# Altium PCB SYNCBOX.PcbDoc (part 6 of 6)
Units mil, origin at the board's own origin, x right, y up, seen from the top; angles counter-clockwise.
Board outline 8392.2 x 6163.59 mil, 6 copper layers (L1, L2, L3, L4 (PWR), L5, L6), stack 60.709 mil thick; 316 components, 422 nets, 1421 pads, 499 vias.
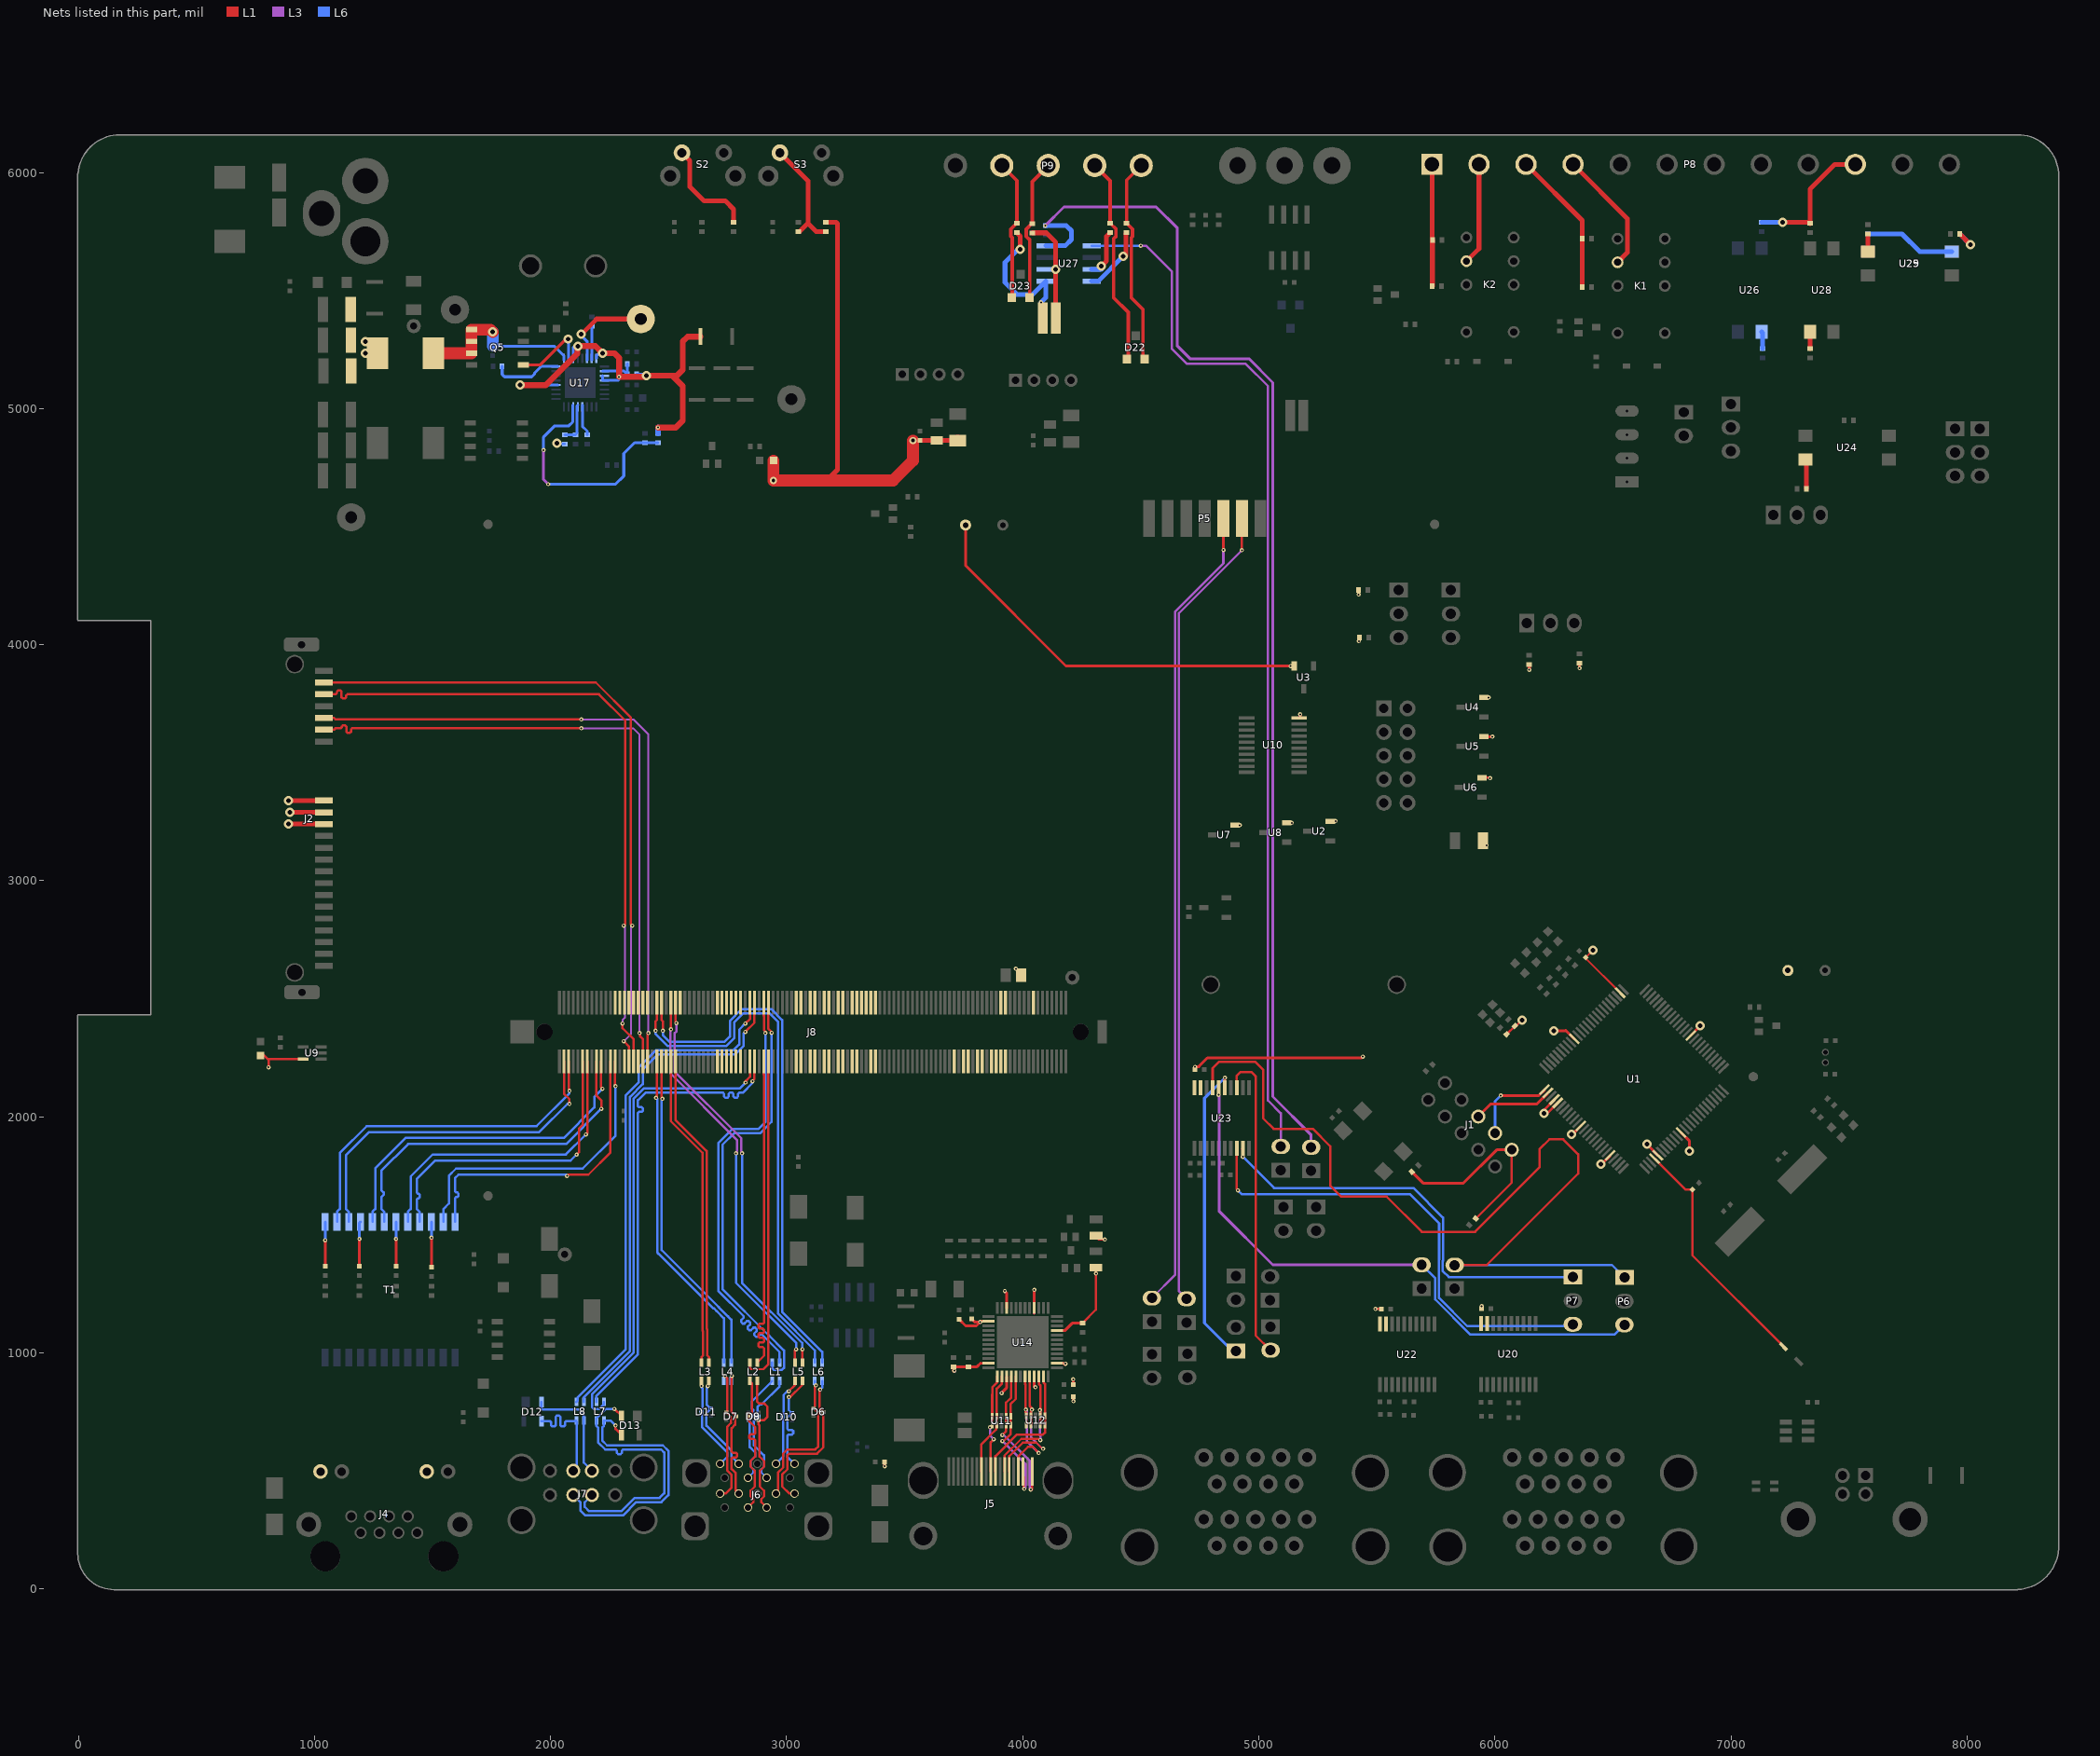
[diagram p8: the nets of this part, all layers, seen from the top]

## Via types
v1: diameter 17.72, hole 7.87, L1 to L6, tented both sides, 369 vias
v2: diameter 39.37, hole 19.68, L1 to L6, tented both sides, 116 vias
v3: diameter 236.22, hole 110.24, L1 to L6, 4 vias
v4: diameter 283.46, hole 125.98, L1 to L6, 4 vias
v5: diameter 472.44, hole 393.7, L1 to L6, 4 vias
v6: diameter 30, hole 15, L1 to L6, tented both sides, 2 vias

## Nets (pads, with @x,y where several pads share a name; then routed paths per layer and width w, separated by ;. In a path a pad name is that pad's centre, name@x,y a point inside that pad or via, vN(x,y) a via of type N, cw(c..) or ccw(c..) an arc to the next point about the centre after c; other vN are vias at no path point) (continued)
NetR27_1: R27.1 U17.24 | length 295.5
  L6 w12: R27.1@1794.68,5180 1794.68,5145.31 1805,5135 1920,5135 1931.91,5146.91 1931.91,5151.18 1959.63,5178.9 U17.24@2022.51,5178.9 U17.24@2030.51,5178.9
NetR28_2: R28.2 R29.2 U17.14 | length 1023.7
  L3 w12: v1(1970,4825) 1970,4700 v1(1990,4680)
  L6 w12: v1(1970,4825) 1970,4880 2017.5,4927.5 2077.5,4927.5 2094,4944 U17.14@2094,5015.51 ; v1(1990,4680) 2275,4680 2310,4715 2310,4810 2355.63,4855.63 R29.2@2400,4855.63 R28.2@2455,4855.63
NetR30_1: R30.1 U17.31 | length 145.8
  L6 w12: U17.31@2174.21,5204.49 U17.31@2174.21,5212.49 2174.21,5349.21 R30.1@2175,5350
NetR31_2: R31.2 U17.12 | length 133.9
  L6 w12: U17.12@2134.84,5015.51 U17.12@2134.84,5007.51 2134.84,4925.16 2155,4905 R31.2@2155,4890
NetR32_1: R32.1 R33.1 U17.13 | length 174.7
  L6 w12: R32.1@2060,4890 R33.1@2105,4890 2111.91,4896.91 2111.91,5012.26 U17.13@2115.16,5015.51
NetR34_2: R34.2 R35.2 U17.2 | length 156.8
  L6 w12: U17.2@2219.49,5159.21 U17.2@2227.49,5159.21 2311.1,5159.21 R35.2@2325.31,5145 2325.31,5189.69 R34.2@2325,5190
NetR36_2: R36.2 S2.2 | length 437.9
  L1 w20: S2.2@2556.42,6084.02 2590,6050.43 2590,5940 2650,5880 2740,5880 2775,5845 R36.2@2775,5789.37
NetR55_2: R55.2 U24.2 | length 126.7
  L1 w20: U24.2@7315.67,4785 7319.69,4780.98 R55.2@7319.69,4660
NetR60_1: R60.1 R76.1 U27.1 | length 565.1
  L1 w20: R76.1@3975,5745.31 3990,5730.31 v2(3990,5675)
  L6 w20: v2(3990,5675) 3980.31,5675 3925,5619.69 3925,5535 3976.2,5483.8 4041.8,5483.8 U27.1@4098,5540 4098,5470.5 v1(4077.5,5450)
NetR60_2: R60.2 R74.1 U27.2 | length 437.7
  L1 w20: R74.1@4040,5745 4100,5745 4140,5705 v2(4140,5590) 4140,5384.28 R60.2@4139.72,5384
NetR61_2: R61.2 U25.1 | length 75.6
  L1 w20: R61.2@7580,5740.31 7580.67,5739.65 U25.1@7580.67,5665
NetR62_2: R62.2 U26.1 | length 73.1
  L6 w20: U26.1@7130,5325.67 7135,5320.67 R62.2@7135,5254.69
NetR63_1: R63.1 U27.8 | length 288.9
  L1 w20: v2(4425,5645) 4435,5645 4436.59,5646.59 4436.59,5741.91 R63.1@4440,5745.31
  L6 w20: U27.8@4292,5540 4320,5540 v2(4425,5645)
NetR64_1: R64.1 U27.7 | length 216.7
  L1 w20: v2(4333.58,5603.91) 4355,5625.33 4355,5730.31 R64.1@4370,5745.31
  L6 w20: U27.7@4292,5590 4332.51,5590 4340,5597.49 v2(4333.58,5603.91)
NetR73_2: R73.2 U28.1 | length 70.3
  L1 w20: R73.2@7335,5254.69 U28.1@7335,5325
NetR75_2: R75.2 U29.1 | length 386.3
  L6 w20: R75.2@7580,5740.63 7724.37,5740.63 7800,5665 U29.1@7935,5665
PC2TRANS_PC_RX: J18.1 U23.15 | length 1303.9
  L1 w12: U23.15@4855.77,2123.87 4855.77,2164.77 v1(4856,2165)
  L6 w12: v1(4856,2165) 4770,2079 4770,1126 J18.1@4903,993
PC2TRANS_PC_TX: J21.2 U23.13 | length 1331.3
  L1 w10: U23.13@4906.95,2123.87 4906.95,2173.95 4923,2190 4968,2190 4986,2172 4987,2172 4987,1074 J21.2@5050,1011
PCIE_CLK_REF+: J8.A88
PCIE_CLK_REF-: J8.A89
PCIE_RX0+: J8.B68
PCIE_RX0-: J8.B69
PCIE_RX1+: J8.B64
PCIE_RX1-: J8.B65
PCIE_RX2+: J8.B61
PCIE_RX2-: J8.B62
PCIE_RX3+: J8.B58
PCIE_RX3-: J8.B59
PCIE_TX0+: J8.A68
PCIE_TX0-: J8.A69
PCIE_TX1+: J8.A64
PCIE_TX1-: J8.A65
PCIE_TX2+: J8.A61
PCIE_TX2-: J8.A62
PCIE_TX3+: J8.A58
PCIE_TX3-: J8.A59
PGEC: J1.3 U1.26 | length 365.5
  L1 w12: v1(6025,2090) 6185.93,2090 U1.26@6210.83,2114.9
  L6 w12: J1.3@6000.71,1930.71 6000.71,2065.71 v1(6025,2090)
PGED: J1.5 U1.27 | length 336
  L1 w12: J1.5@5930,2001.42 5983.58,2055 6178.77,2055 U1.27@6224.75,2100.98
PHASE2_3V3: C47.1 L10.1 Q5.5 Q5.6 Q5.7 U17.25 | length 761.9
  L1 w50: L10.1@1494,5235 L10.1@1503,5235 Q5.7@1665,5235 Q5.6@1665,5285 Q5.5@1665,5335 1745,5335 v2(1755,5325)
  L6 w12: C47.1@1755,5264.37 2016.08,5264.37 2056.1,5224.35 U17.25@2056.1,5212.49 U17.25@2056.1,5204.49
  L6 w50: C47.1@1755,5265.75 v2(1755,5325)
PWR_OUT2: C5.2 C8.2 C16.2 C17.2 C18.2 C19.2 C51.2 C52.2 C53.2 C60.2 C61.2 C69.1 C74.2 C79.2 D3.1 D14.1 F1.2 F4.1 J1.1 J2.8 J2.9 J2.10 J4.10 J4.12 L10.2 LS1.1 LS2.1 R3.2 R5.2 R13.2 R14.2 R16.2 R17.2 R18.2 R22.1 R23.1 R24.1 R32.2 R38.2 R45.2 R46.2 R59.2 R67.2 R68.2 R72.2 TP3.1 U1.2 U1.16 U1.29 U1.30 U1.37 U1.46 U1.55 U1.62 U1.86 U2.2 U3.2 U4.2 U5.2 U6.2 U7.2 U8.2 U9.5 U10.20 U14.2 U14.11 U14.15 U14.21 U14.26 U14.33 U14.40 U14.46 U17.30 U20.19 U20.20 U22.19 U22.20 U23.19 U23.20 | length 9131.9
  L1 w10: D3.1@785,2260.94 800.94,2245 ; v1(805,2210) 805,2240.94 800.94,2245 ; U9.5@952,2244.41 900.59,2244.41 900,2245 800.94,2245 ; 3821.42,956.42 U14.11@3855,956.42 ; R18.2@4253,1125.69 4310,1182.69 v1(4310,1336) R23.1@4310,1362 ; R22.1@4310,1492 4322,1480 v1(4347.5,1480) ; v1(5494,1186) C74.2@5519.31,1186 ; R3.2@5918.92,1568.92 6071.42,1721.42 J1.1@6071.42,1860 ; U6.2@5946,3436.34 5978.66,3436.34 v1(5980,3435) ; U5.2@5953,3611.34 5954.34,3610 v1(5990,3610) ; U4.2@5953,3776.34 v1(5973.66,3776.34) ; R68.2@6050,2350 R67.2@6085,2385 6090,2385 v2(6115,2410) ; v2(6415,2705) C5.2@6385,2675 6385,2671.23 U1.2@6530.98,2525.25
  L1 w12: v1(3415,520) C8.2@3415,537.64 ; v1(3710,924) 3706,924 R17.2@3706,940.31 3769,940.31 R16.2@3770,941.31 3806.31,941.31 3821.42,956.42 ; C18.2@3731,1141.31 3757.96,1114.36 3803.25,1114.36 v1(3819.78,1130.89) ; LS1.1@3758,4507 3758,4335 4183,3910 v1(5135,3910) U3.2@5150,3910 ; C19.2@3781.99,1141.31 C19.2@3783.94,1143.27 3796.32,1130.89 v1(3819.78,1130.89) ; U14.2@3855,1133.58 3822.47,1133.58 v1(3819.78,1130.89) ; v1(3911,830) 3911,831 3931.1,851.1 U14.15@3931.1,900 ; v1(3924,1262) 3931.1,1254.9 U14.46@3931.1,1190 ; v1(4049,1267) 4049.21,1266.79 U14.40@4049.21,1190 U14.40@4049.21,1167.69 ; U14.21@4049.21,900 4049.21,858.79 v1(4054,854) ; U14.26@4145,956.42 4173.15,956.42 4178.13,951.44 4178.44,951.44 v1(4181,954) ; U14.33@4145,1094.21 4178.21,1094.21 4209.69,1125.69 R18.2@4253,1125.69 ; C16.2@4213.69,865 4213.69,887.69 v1(4214,888) ; v1(4214.69,795.31) C17.2@4214.69,814 ; C79.2@4729.31,2200 4729.31,2211.31 v1(4730,2212) 4746.94,2212 4746.94,2214.77 4782.07,2249.91 5435.91,2249.91 v1(5441,2255) ; U7.2@4900,3235 v1(4920,3235) ; U8.2@5118,3246.34 5138.66,3246.34 v1(5140,3245) ; U10.20@5171,3690.16 5175,3694.16 v1(5175,3705) ; U2.2@5303,3251.34 5323.66,3251.34 v1(5325,3252.68) ; v1(5423,4213) 5423.31,4213.31 R13.2@5423.31,4231 ; v1(5424,4015) 5424,4027.69 R14.2@5427.31,4031 ; R5.2@5648.08,1767.08 5696.16,1719 5867,1719 6008,1860 J1.1@6071.42,1860 ; C69.1@5942.05,1185.73 C69.1@5944.31,1188 v1(5944.32,1197.85) ; v1(6146,3894) R45.2@6146,3916.31 ; v2(6250,2365) 6298.52,2365 6300,2366.48 U1.16@6336.11,2330.37 ; U1.29@6252.59,2073.14 6208.37,2028.92 v2(6208.37,2015) 6222.29,2015 U1.30@6266.51,2059.22 ; v2(6325,1925) 6327.16,1925 U1.37@6363.95,1961.79 ; R46.2@6358,3922.31 6358,3901 v1(6359,3901) ; v2(6450,1800) 6452.71,1800 U1.46@6489.22,1836.51 ; v2(6645,1885) 6645,1882.29 U1.55@6690.78,1836.51 ; U1.62@6788.21,1933.95 6825,1897.16 v2(6825,1855) ; U1.86@6829.97,2344.29 6870,2384.32 v2(6870,2385)
  L1 w20: v2(890,3240) J2.10@1040,3240 ; v2(890,3340) J2.8@1040,3340 ; v2(895,3290) J2.9@1040,3290 ; v2(2130,5315) 2195,5380 TP3.1@2381.97,5380 ; R38.2@3165,5789.37 3209.37,5789.37 3215,5783.74 3215,4740.94 3170,4695.94 ; v6(3535,4865) 3535.63,4865.63 C61.2@3565,4865.63 3634.57,4865.63 C60.2@3635,4865.2 3724.8,4865.2 F4.1@3725,4865 ; R59.2@7970,5740 v2(8015,5695)
  L1 w50: L10.2@1267,5235 L10.2@1275,5227 ; D14.1@2944.06,4780 v6(2944.06,4695.94) 3170,4695.94 3450.94,4695.94 3535,4780 v6(3535,4865) ; F4.1@3724.09,4864.09 F4.1@3725,4865
  L3 w10: v2@2023.09,4853.09 v2(2026.59,4853.09)
  L3 w12: v1@3708,924 v1(3710,924)
  L6 w10: v2(2026.59,4853.09) 2025.63,4852.12 2025.63,4850.63 R32.2@2060,4850.63
  L6 w12: v2(2130,5315) 2130,5310 2154.53,5285.47 U17.30@2154.53,5212.49 U17.30@2154.53,5204.49 ; v1@3815.74,1130.89 v1(3819.78,1130.89) ; v1@3907.22,830 v1(3911,830)
  L6 w20: R72.2@7969.37,5740 7970,5740 v2(8015,5695)
  other v1: 3970.5,2627.5 5965,3150
  other v2: 1215,5235 1215,5285
R1+: K1.9 P8.4 | length 527
  L1 w20: P8.4@6331.45,6035 6560.91,5805.55 6560.91,5660.91 K1.9@6520,5620
R1-: P8.3 R49.2 R51.2 | length 618.5
  L1 w20: P8.3@6132.18,6035 6370,5797.18 R49.2@6370,5720 R51.2@6370,5515
R2+: K2.9 P8.2 | length 431.9
  L1 w20: K2.9@5880,5625 5932.91,5677.91 P8.2@5932.91,6035
R2-: P8.1 R50.2 R53.2 | length 516
  L1 w20: P8.1@5733.64,6035 5733.64,5716.99 R50.2@5735.63,5715 5735.31,5714.69 R53.2@5735.31,5520
RS485_DI: J23.2 U27.5 | length 4428.7
  L3 w10: v1(4500,5690) 4523,5690 4631,5582 4631,5255 4696,5190 4944.5,5190 5038.5,5096 5038.5,2069.5 5093,2015 J23.2@5093,1874
  L6 w10: U27.5@4292,5690 v1(4500,5690)
RS485_RES_N: D23.1 P9.4 R76.2 | length 609.8
  L1 w15: P9.4@3911.3,6030 3975,5966.3 R76.2@3975,5784.69 3973.76,5784.69 3949.78,5760.71 3949.78,5729.92 3955.2,5724.51 D23.1@3955.2,5460
RS485_RES_P: D23.2 P9.3 R74.2 | length 615.7
  L1 w15: D23.2@4030,5460 4030,5714.39 4014.78,5729.6 4014.78,5760.4 4038.76,5784.37 R74.2@4040,5784.37 4040,5961.85 P9.3@4108.15,6030
RS485_RO: C83.2 J24.2 U27.4 | length 5182.4
  L3 w12: v1(4095,5775) 4175,5855 4565,5855 4655,5765 4655,5265 4708.31,5211.69 4958.31,5211.69 5059.41,5110.59 5059.41,2085.59 5222,1923 J24.2@5222,1871
  L6 w20: v1(4095,5775) 4185,5775 4206.22,5753.78 4206.22,5716.22 4180,5690 U27.4@4098,5690
RS485_SND_N: D22.2 P9.1 R63.2 | length 886.3
  L1 w15: P9.1@4501.85,6030 4440,5968.15 R63.2@4440,5784.69 4441.24,5784.69 4465.22,5760.71 4465.22,5729.92 4460,5724.7 4460,5470 4509.12,5420.88 D22.2@4509.12,5203
RS485_SND_P: D22.1 P9.2 R64.2 | length 894.8
  L1 w15: P9.2@4305,6030 4370,5965 R64.2@4370,5784.69 4371.24,5784.69 4395.22,5760.71 4395.22,5729.92 4385.2,5719.9 4385.2,5470 4446.88,5408.32 D22.1@4446.88,5203
RST_BTN_HDR: R38.1 R39.2 S3.2 | length 492.1
  L1 w20: S3.2@2971.42,6084.02 3090,5965.43 3090,5785.22 ; R39.2@3050,5750 3054.78,5750 3090,5785.22 ; R38.1@3165,5750 3125.22,5750 3090,5785.22
RSVD1: J8.A52
RSVD2: J8.A53
RSVD3: J8.A55
RSVD4: J8.A56
RSVD5: J8.A86
RSVD6: J8.B52
RSVD7: J8.B53
RSVD8: J8.B55
RSVD9: J8.B56
SATA1_RX+: J8.B19
SATA1_RX-: J8.B20
SATA1_TX+: J8.B16
SATA1_TX-: J8.B17
SATA_CON_RX_N: J2.5 J8.A20 | length 2789
  L1 w9.84: J2.5@1040,3689.8 1082.32,3689.8 1088.62,3683.5 v1(2130,3683.5) ; J8.A20@2411.02,2235.34 2411.02,2351.81 v1(2414.21,2355)
  L3 w7.87: v1(2130,3683.5) 2350.47,3683.5 2414.21,3619.77 v1(2414.21,2355)
SATA_CON_RX_P: J2.6 J8.A19 | length 2786.3
  L1 w9.84: J2.6@1040,3639.8 1082.32,3639.8 1088.62,3646.1 1109.92,3646.1 1114.84,3651.02 1114.84,3653.03 1119.76,3657.95 1129.61,3657.95 1134.53,3653.03 1134.53,3631.02 1139.45,3626.1 1149.29,3626.1 1154.21,3631.02 1154.21,3641.18 1159.13,3646.1 v1(2130,3646.1) ; v1(2376.81,2355) 2380,2351.81 2380,2340 2391.33,2328.67 J8.A19@2391.33,2235.34
  L3 w7.87: v1(2130,3646.1) 2348.9,3646.1 2376.81,3618.19 v1(2376.81,2355)
SATA_CON_TX_N: J2.3 J8.A17 | length 2844.4
  L1 w9.84: J2.3@1040,3789.8 1089.92,3789.8 1094.84,3794.72 1094.84,3802.11 1099.76,3807.03 1109.61,3807.03 1114.53,3802.11 1114.53,3777.49 1119.45,3772.57 1129.29,3772.57 1134.21,3777.49 1134.21,3784.88 1139.13,3789.8 2205.2,3789.8 2315,3680 2315,2815.91 v1(2309.09,2810) ; v1(2305,2395) 2305,2375 2351.96,2328.04 J8.A17@2351.96,2235.34
  L3 w7.87: v1(2305,2395) 2305,2410.98 2314.02,2420 2314.02,2805.08 v1(2309.09,2810)
SATA_CON_TX_P: J2.2 J8.A16 | length 2844.4
  L1 w9.84: J2.2@1040,3839.8 2191.39,3839.8 2340.59,3690.6 2340.59,2815.91 v1(2346.5,2810) ; v1(2310,2320) 2332.28,2297.72 J8.A16@2332.28,2235.34
  L3 w7.87: v1(2310,2320) 2341.57,2351.57 2341.57,2805.08 v1(2346.5,2810)
SER1_RS_RX: P7.1 U23.9 | length 1779.9
  L1 w10: v1(4932,1831) 4932,1861.46 4930,1863.46 U23.9@4932.54,1866
  L6 w10: v1(4932,1831) 5065,1698 5655,1698 5779.91,1573.09 5779.91,1389.74 5779.72,1389.56 5779.72,1346.28 5805,1321 P7.1@6330.6,1321
SER1_RS_TX: P7.3 U23.8 | length 2025.1
  L1 w10: U23.8@4906.95,1866 4906.95,1693.05 v1(4912,1688)
  L6 w10: v1(4912,1688) 4927,1673 5639,1673 5764,1548 5764,1396.33 5763.82,1396.15 5763.82,1321.67 5763.91,1321.59 5763.91,1232.59 5883.49,1113 6322.6,1113 P7.3@6330.6,1121
SLEEP#: J8.B103
SMB_ALERT#: J8.B15
SMB_CK: J8.B13
SMB_DAT: J8.B14
SPI_CLK: J8.A94
SPI_CS#: J8.B97
SPI_MISO: J8.A92
SPI_MOSI: J8.A95
SPI_PWR: J8.A91
SSRX0_CON_N: D7.2 J6.5 L4.4 | length 561.3
  L1 w9.84: J6.5@2718.15,404.06 2740.72,404.06 2766.38,429.72 2766.38,482.81 2748.66,500.52 2748.66,687.87 2763.69,702.89 2763.69,727.61 D7.2@2748.66,742.63 ; v1(2739,902) 2746.35,894.65 2746.35,894.03 2748.66,891.72 2748.66,746.75 D7.2@2748.66,742.63 ; D7.2@2744,746.75 2744.55,746.75 D7.2@2748.66,742.63
SSRX0_CON_P: D7.1 J6.6 L4.3 | length 561.3
  L1 w9.84: v1(2768,903) 2768,894 2766.38,892.38 2766.38,749.97 2781.4,734.95 2781.4,731 2781.4,695.56 2766.38,680.53 2766.38,582.27 2771.34,577.31 2785.52,577.31 2790.49,572.35 2790.49,562.43 2785.52,557.47 2771.34,557.47 2766.38,552.51 2766.38,507.86 2784.09,490.15 2784.09,416.85 J6.6@2796.89,404.06
SSRX0_N: J8.A22 L4.1 | length 1395.8
  L1 w9.84: v1(2447,2080.62) 2450.39,2084.01 J8.A22@2450.39,2235.34
  L6 w9.84: v1(2447,2080.62) 2451.35,2076.28 2451.35,1425.65 2455,1422 ; 2457,1420 2689.31,1187.69 2693.15,1187.69 2704.69,1176.15 2704.85,1176.15 2734.25,1146.75 L4.1@2734.25,959.42
SSRX0_P: J8.A23 L4.2 | length 1403.7
  L1 w9.84: J8.A23@2470.07,2235.34 2470.07,2076.21 2471.64,2074.64 v1@2473,2073.28
  L6 w9.84: v1(2473,2076) 2470,2073 2470,1436.05 2710.87,1195.18 2710.87,1195.02 2712.02,1193.87 2712.18,1193.87 2751.97,1154.09 2751.97,1154.03 2765.75,1140.25 L4.2@2765.75,959.42
SSRX1_CON_N: D11.1 J6.14 L3.3 | length 409.9
  L1 w9.84: v1(2639,860) 2639.25,860.25 L3.3@2639.25,880.58
  L6 w9.84: v1(2639,860) 2639,853 2644,848 2644,754.6 2642.6,753.2 2642.6,749.25 2642.6,684.06 2748.66,578 2748.66,560.55 J6.14@2718.15,530.04
SSRX1_CON_P: D11.2 J6.15 L3.4 | length 405.2
  L6 w9.84: v1(2666,859) 2661.72,854.72 2661.72,779.25 2675.97,765 D11.2@2679.45,765 ; D11.2@2680,765 D11.2@2679.45,765 ; J6.15@2796.89,530.04 2766.38,560.55 2766.38,585.34 2660.31,691.4 2660.31,745.86 D11.2@2679.45,765
SSRX1_N: J8.A25 L3.2 | length 1335.4
  L1 w9.84: J8.A25@2509.44,2235.34 2509.44,1981.56 2643,1848 2643,1094.14 2646.14,1091 2646.14,988.99 2639.25,982.1 L3.2@2639.25,959.42
SSRX1_P: J8.A26 L3.1 | length 1335.1
  L1 w9.84: J8.A26@2529.13,2235.34 2529.13,2180.42 2528.53,2179.82 2528.53,1987.53 2660.72,1855.34 2660.72,1101.48 2663.86,1098.34 2663.86,988.99 2670.75,982.1 L3.1@2670.75,959.42
SSTX0_CON_N: D6.2 J6.8 L6.4 | length 647.3
  L1 w10: J6.8@2958.36,404.06 J6.8@2954.37,404.06 2963,412.69 2963,492.2 2985.13,514.33 2985.13,573.13 3003,591 3121,591 3133.43,603.43 3133.43,746.64 3127.04,753.03 3126.38,753.03 D6.2@3113.66,765.75 3119.63,771.71 3119.63,857.82 v1(3123.9,862.1)
  L6 w10: L6.4@3119.25,880.58 3119.25,857.82 3119.63,857.82 v1(3123.9,862.1)
SSTX0_CON_P: D6.1 J6.9 L6.3 | length 661.4
  L1 w10: J6.9@3033.11,404.06 3011.1,404.06 2980.87,434.28 2980.87,484.8 3003,506.93 3003,565.72 3010.4,573.13 3128.4,573.13 3155,599.72 D6.1@3155,750 ; v1(3142,844) 3140,842 3140,765.35 3151.3,754.05 D6.1@3151.3,750
  L6 w10: v1(3142,844) 3150.75,852.75 L6.3@3150.75,880.58
SSTX0_N: J8.B22 L6.1 | length 2294.5
  L1 w9.84: v1(2445,2365) 2445,2405 2450.39,2410.39 J8.B22@2450.39,2484
  L6 w9.84: v1(2445,2365) 2445,2350.95 2496.66,2299.28 2743.34,2299.28 2777,2332.95 2777,2399 2817,2439 2927,2439 2963,2403 2963,1167.1 3119.25,1010.85 L6.1@3119.25,959.42
SSTX0_P: J8.B23 L6.2 | length 2294.9
  L1 w9.84: J8.B23@2470.07,2484 2470.07,2410 2475,2405.07 v1(2475,2365)
  L6 w9.84: v1(2475,2365) 2475,2346 2504,2317 2736,2317 2759.28,2340.28 2759.28,2406.34 2809.66,2456.72 2934.34,2456.72 2980.72,2410.34 2980.72,1174.44 3150.75,1004.41 L6.2@3150.75,959.42
SSTX1_CON_N: D10.1 J6.17 L5.3 | length 390.4
  L1 w10: v1(3009,838) 3035,864 L5.3@3035,880.58
  L6 w10: J6.17@2954.37,530.04 2984.8,560.47 2984.8,687 2984.36,687.44 2984.36,725.55 D10.1@2980.66,729.25 2984.36,732.95 2984.36,733.3 2987.27,736.2 2987.27,821.41 3003.86,838 v1(3009,838)
SSTX1_CON_P: D10.2 J6.18 L5.4 | length 442.4
  L1 w10: v1(3009,812.41) 3014.14,812.41 3066.5,864.76 L5.4@3066.5,880.58
  L6 w10: v1(3009,812.41) 3009,758 D10.2@3022,745 3009.28,732.28 3008.62,732.28 3002.24,725.9 3002.24,701.11 3002.68,700.67 3002.68,679 3007.68,674 3022.68,674 3027.68,669 3027.68,659 3022.68,654 3007.68,654 3002.68,649 3002.68,560.47 J6.18@3033.11,530.04
SSTX1_N: J8.B25 L5.2 | length 1753.9
  L1 w10: J8.B25@2509.44,2484 2509.44,2379.44 2510,2378.88 v1(2510,2371) ; L5.2@3035,959.42 3035,1010 v1(3040,1015)
  L3 w10: v1(2510,2371) 2510,2363.75 2508.13,2361.87 2508.13,2183.5 2789.63,1902 2789.63,1848.86 v1(2785.77,1845)
  L6 w10: v1(2785.77,1845) 2785.77,1296.67 3041,1041.44 3041,1023 3040,1022 v1(3040,1015)
  L6 w15: v1(2785.77,1845) v1@2787.13,1843.64
SSTX1_P: J8.B26 L5.1 | length 1754.6
  L1 w10: J8.B26@2529.13,2484 2529.13,2400.54 v1(2532.67,2397) ; L5.1@3066.5,959.42 v1(3066.5,1015.5)
  L3 w10: v1(2532.67,2397) 2532.67,2361.14 2526,2354.47 2526,2190.9 2807.5,1909.4 2807.5,1848.86 v1(2811.36,1845)
  L6 w10: v1(2811.36,1845) 2811.36,1296.36 3065.36,1042.36 3065.36,1027.64 3066.5,1026.5 v1(3066.5,1015.5)
  L6 w15: v1@2810,1843.64 v1(2811.36,1845)
SUS_S3: J8.A15
SUS_S4#: J8.A18
SUS_S5#: J8.A24
SUS_STAT#: J8.B18
TCT0: C12.2 T1.10 | length 192.8
  L1 w12: C12.2@1495,1362.32 v1(1495,1487.64)
  L6 w12: v1(1495,1487.64) T1.10@1495,1555.14
TCT1: C10.2 T1.4 | length 189.6
  L1 w12: C10.2@1190,1367.64 v1(1190,1482.64)
  L6 w12: v1(1190,1482.64) 1190,1550.14 T1.4@1195,1555.14
TCT2: C11.2 T1.7 | length 187.8
  L1 w12: C11.2@1345,1367.32 v1(1345,1482.64)
  L6 w12: v1(1345,1482.64) T1.7@1345,1555.14
TCT3: C9.2 T1.1 | length 187.8
  L1 w12: C9.2@1045,1367.32 v1(1045,1477.64)
  L6 w12: v1(1045,1477.64) T1.1@1045,1555.14
THRM#: J8.B35
THRMTRIP#: J8.A35
TMDS_CLK_N: J5.12 U11.2 U11.9 U14.14 | length 439.1
  L1 w10: J5.12@3824.63,497 3824.63,612.91 3880.85,669.13 3881.05,669.13 3887.44,675.51 3887.44,690.98 U11.2@3890.31,693.86 3890.31,848.32 3911.42,869.42 U14.14@3911.42,900
TMDS_CLK_P: J5.10 U11.1 U11.10 U14.13 | length 427.7
  L1 w10: v1(3861,684.23) U11.1@3870.63,693.86 U11.10@3870.63,732.14 3870.63,822.91 3872.44,824.72 3872.44,855.72 3891.73,875.01 U14.13@3891.73,900 ; J5.10@3864,497 3864,621 v1(3877,634)
  L3 w10: v1(3861,684.23) 3861,650 v1(3877,634)
TMDS_D0_N: J5.9 U12.1 U12.10 U14.23 | length 557
  L1 w10: J5.9@3883.69,497 3883.69,562 3975.34,653.65 4085.65,653.65 4094.06,662.06 U12.10@4094.06,694.72 U12.1@4094.06,733 4094.06,867.79 4088.58,873.26 U14.23@4088.58,900
TMDS_D0_P: J5.7 U12.2 U12.9 U14.22 | length 588.4
  L1 w10: J5.7@3923.06,497 3923.06,564.81 3994.03,635.78 4069.22,635.78 v1(4075,630) ; U14.22@4068.9,900 4068.9,867.67 4074.37,862.2 U12.2@4074.37,733 U12.9@4074.37,694.72
  L3 w10: v1(4072.32,757.94) 4072.32,650.68 4075.35,647.65 4075,647.29 v1(4075,630)
TMDS_D1_N: J5.6 U12.4 U12.7 U14.20 | length 641.1
  L1 w10: J5.6@3942.74,497 3942.74,562 4000.61,619.87 4057.18,619.87 4082.95,594.1 v1(4086.1,594.1) ; U14.20@4029.53,900 4029.53,774.47 4035,769 U12.4@4035,733 U12.7@4035,694.72
  L3 w10: v1(4038.86,760) 4035,756.14 4035,642.05 4082.95,594.1 v1(4086.1,594.1)
TMDS_D1_P: J5.4 U12.5 U12.6 U14.19 | length 592.4
  L1 w10: J5.4@3982.11,497 3982.11,562 4022.11,602 4042,602 v1(4068,576) ; U14.19@4009.84,900 4009.84,867.67 4011.65,865.86 4011.65,749.9 4015.31,746.23 U12.5@4015.31,733 U12.6@4015.31,694.72
  L3 w10: v1(4013.27,760) 4017.13,756.14 4017.13,626.87 v1(4068,576)
TMDS_D2_N: J5.3 U11.5 U11.6 U14.17 | length 595.5
  L1 w10: v1(3914,626.41) 3919.14,626.41 3949.37,656.64 U11.5@3949.37,693.86 U11.6@3949.37,732.14 3949.37,784.09 3970.47,805.19 U14.17@3970.47,900 ; v1@4004.67,424 J5.3@4004.67,474
  L3 w10: v1(3914,626.41) 4012,528.41 4012,430 v1(4006,424)
TMDS_D2_P: J5.1 U11.4 U11.7 U14.16 | length 599.6
  L1 w10: v1(3914,652) 3929.69,667.68 3929.69,789.68 3950.79,810.79 U14.16@3950.79,900 ; v1@4036.7,421.05 4039.67,424.02 J5.1@4039.67,472.62
  L3 w10: v1(3914,652) 3919.14,652 4029.87,541.27 4029.87,424.91 v1(4033.73,421.05)
TPM_PP: J8.A96
TRANS2LCD_RX: J20.2 P5.6 | length 3429.7
  L1 w10: v1(4928,4400) 4928.74,4400.74 P5.6@4928.74,4535
  L3 w10: J20.2@4694,1229 4662,1261 4662,4134 v1(4928,4400)
TRANS2LCD_TX: J19.2 P5.5 | length 3435.6
  L1 w10: v1(4850,4401) P5.5@4850,4535 P5.5@4855,4530
  L3 w10: J19.2@4547,1232 4646.09,1331.09 4646.09,4140.59 4850,4344.49 v1(4850,4401)
TRANS2TRANS_RX: J15.2 P6.1 U23.17 | length 3899
  L1 w10: U23.17@4804.59,2123.87 4804.59,2206 4831.59,2233 4985,2233 5018,2200 5018,1994 5063,1949 5229,1949 5302.5,1875.5 5302.5,1708.5 5349,1662 5542,1662 5691,1513 5916.23,1513 6189,1785.77 6189,1863 6231,1905 6289.24,1905 6353,1841.24 6353,1759 5966,1372 J15.2@5830,1372
  L6 w10: J15.2@5830,1372 6496,1372 P6.1@6549,1319
TRANS2TRANS_TX: J14.2 P6.3 U23.16 | length 2499.4
  L1 w12: v1(4830,2093) 4831,2094 U23.16@4831,2095
  L3 w12: v1(4830,2093) 4833,2090 4833,1599 5059,1373 J14.2@5690,1373
  L6 w10: J14.2@5690,1373 5748,1315 5748,1226 5897,1077 6507,1077 P6.3@6549,1119
TRD0_N: J8.A12 T1.12 | length 1297.6
  L1 w9.84: v1(2070,1750) 2075,1755 2160,1755 2253.54,1848.54 J8.A12@2253.54,2235.34
  L6 w9.84: T1.12@1595,1555.14 1595,1654.61 1599.92,1659.53 1605.01,1659.53 1609.93,1664.45 1609.93,1674.29 1605.01,1679.21 1599.92,1679.21 1595,1684.13 1595,1740 1610,1755 2065,1755 v1(2070,1750)
TRD0_P: J8.A13 T1.11 | length 1297.4
  L1 w9.84: J8.A13@2273.22,2235.34 2273.22,2131.78 v1(2275,2130)
  L6 w9.84: T1.11@1545,1555.14 1545,1608.16 1569.41,1632.57 1569.41,1750.6 1599.4,1780.59 2135.59,1780.59 2275,1920 v1(2275,2130)
TRD1_N: J8.A9 T1.6 | length 1480.5
  L1 w9.84: J8.A9@2194.48,2235.34 2194.48,2090.52 2215,2070 v1(2215,2033.81)
  L6 w9.84: T1.6@1295,1555.14 1295,1597.56 1282.8,1609.76 1282.8,1659.61 1292.64,1669.45 1292.64,1679.29 1282.8,1689.13 1282.8,1771.6 1396.19,1885 2066.19,1885 v1(2215,2033.81)
TRD1_P: J8.A10 T1.5 | length 1479
  L1 w9.84: J8.A10@2214.17,2235.34 2214.17,2124.83 v1(2220,2119)
  L6 w9.84: T1.5@1245,1555.14 1245,1597.56 1257.2,1609.76 1257.2,1782.2 1385.59,1910.59 2055.59,1910.59 2185,2040 2185,2084 v1(2220,2119)
TRD2_N: J8.A6 T1.9 | length 1327
  L1 w9.84: v1(2110,1840) 2119.88,1849.88 2119.88,1949.88 2135.43,1965.43 J8.A6@2135.43,2235.34
  L6 w9.84: T1.9@1445,1555.14 1445,1597.56 1432.8,1609.76 1432.8,1649.61 1437.72,1654.53 1440.93,1654.53 1445.85,1659.45 1445.85,1669.29 1440.93,1674.21 1437.72,1674.21 1432.8,1679.13 1432.8,1736.6 1511.19,1815 2085,1815 v1(2110,1840)
TRD2_P: J8.A7 T1.8 | length 1325.7
  L1 w9.84: v1(2149.41,1925) 2155.11,1930.7 J8.A7@2155.11,2235.34
  L6 w9.84: T1.8@1395,1555.14 1395,1597.56 1407.2,1609.76 1407.2,1747.2 1500.59,1840.59 2065,1840.59 v1(2149.41,1925)
TRD3_N: J8.A2 T1.3 | length 1514.2
  L1 w9.84: J8.A2@2056.68,2235.34 2056.69,2098.31 2080,2075 v1(2080,2055)
  L6 w9.84: T1.3@1145,1555.14 1145,1597.56 1132.8,1609.76 1132.8,1836.6 1231.19,1935 1951.19,1935 2071.19,2055 v1(2080,2055)
TRD3_P: J8.A3 T1.2 | length 1511.5
  L1 w9.84: J8.A3@2076.37,2235.34 2076.37,2113.63 v1(2080,2110)
  L6 w9.84: T1.2@1095,1555.14 1095,1597.56 1107.2,1609.76 1107.2,1847.2 1220.59,1960.59 1940.59,1960.59 2080,2100 v1(2080,2110)
TYPE10#: J8.A97
UGATE2_3V3: Q5.1 U17.26 | length 325.9
  L1 w12: Q5.1@1885.47,5185 1955,5185 2065,5295 v2(2075,5295)
  L6 w12: v2(2075,5295) 2075.79,5294.21 U17.26@2075.79,5212.49 U17.26@2075.79,5204.49
USB0_CON_N: D8.2 J6.2 L2.4 | length 637
  L1 w9.84: L2.4@2875,880.58 2875,793 2883,785 2906,785 2919,772 2919,729 2905,715 D8.2@2880,715 2880,697.83 2884.49,693.34 2884.49,561.55 2904.17,541.86 2904.17,518.22 2886.46,500.5 2886.46,433.59 2904.17,415.88 2904.17,392.23 2892.36,380.42 2892.36,367.64 J6.2@2915,345
USB0_CON_P: D8.1 J6.3 L2.3 | length 632.6
  L1 w9.84: J6.3@2836.26,345 2858.9,367.64 2858.9,380.42 2847.09,392.23 2847.09,415.88 2864.8,433.59 2864.8,500.5 2847.09,518.22 2847.09,541.86 2866.77,561.55 2866.77,629.96 2861.81,634.92 2846.73,634.92 2841.77,639.88 2841.77,649.8 2846.73,654.76 2861.81,654.76 2866.77,659.72 2866.77,686 2838.66,714.11 D8.1@2838.66,730.75 2853,745.09 2853,871.09 L2.3@2843.5,880.58
USB0_N: J8.A45 L2.1 | length 1396.2
  L1 w9.84: L2.1@2875,959.42 2904.13,988.54 2904.13,1018.96 2899.17,1023.92 2885.3,1023.92 2880.34,1028.88 2880.34,1038.8 2885.3,1043.76 2899.17,1043.76 2904.13,1048.72 2904.13,1058.65 2899.17,1063.61 2885.3,1063.61 2880.34,1068.57 2880.34,1078.49 2885.3,1083.45 2899.17,1083.45 2904.13,1088.41 2904.13,1098.33 2899.17,1103.29 2885.3,1103.29 2880.34,1108.25 2880.34,1118.17 2885.3,1123.13 2899.17,1123.13 2904.13,1128.09 2904.13,2179.43 2903.14,2180.42 J8.A45@2903.14,2235.34
USB0_P: J8.A46 L2.2 | length 1396.2
  L1 w9.84: L2.2@2843.5,959.42 2843.5,937.5 2850.17,930.83 2901.83,930.83 2921.84,950.84 2921.84,2179.43 2922.83,2180.42 J8.A46@2922.83,2235.34
USB1_CON_N: D9.1 J6.11 L1.3 | length 489.8
  L6 w9.84: J6.11@2915,470.98 2892.36,493.62 2892.36,506.41 2904.17,518.22 2904.17,541.86 2904,542.04 2904,565.83 2861.65,608.18 2861.65,712.38 2876.06,726.8 2876.06,730.75 2876.06,757.06 2876.31,757.31 2876.31,770.15 2887.85,781.69 2893.69,781.69 2970,858 L1.3@2970,880.58
USB1_CON_P: D9.2 J6.12 L1.4 | length 492.4
  L6 w9.84: J6.12@2836.26,470.98 2858.9,493.62 2858.9,506.41 2847.09,518.22 2847.09,541.86 2866.77,561.55 2866.77,578 2843.93,600.84 2843.93,715 D9.2@2843.93,719.72 ; D9.2@2838.66,715 2839.21,715 D9.2@2843.93,719.72 ; L1.4@2938.5,880.58 2852.85,794.93 2852.85,764.35 2858.35,758.85 2858.35,734.14 D9.2@2843.93,719.72
USB1_N: J8.B45 L1.2 | length 1895.6
  L1 w9.84: J8.B45@2903.14,2484 2903.14,2429.08 2904.13,2428.09 2904.13,2366.44 2910,2360.57 v1(2910,2355)
  L6 w9.84: v1(2910,2355) 2910,1978 2880,1948 2769.66,1948 2710.28,1888.62 2710.28,1262.7 2817.32,1155.67 2817.32,1148.65 2806.87,1138.21 2806.87,1131.2 2813.89,1124.18 2820.91,1124.18 2831.35,1134.62 2838.36,1134.62 2845.38,1127.61 2845.38,1120.59 2834.94,1110.15 2834.94,1103.14 2841.95,1096.12 2848.97,1096.12 2859.41,1106.56 2866.42,1106.56 2873.44,1099.55 2873.44,1092.53 2863,1082.09 2863,1075.07 2870.01,1068.06 2877.03,1068.06 2887.47,1078.5 2894.48,1078.5 2970,1002.98 L1.2@2970,959.42
USB1_P: J8.B46 L1.1 | length 1894.6
  L1 w9.84: J8.B46@2922.83,2484 2922.83,2429.08 2921.84,2428.09 2921.84,2373.78 2936,2359.62 v1(2936,2356)
  L6 w9.84: v1(2936,2356) 2936,1978.95 2887.34,1930.28 2777,1930.28 2728,1881.28 2728,1270.04 2924.04,1074 2925.05,1074 2988.7,1010.35 2988.7,936.7 2979,927 2947,927 2938.5,935.5 L1.1@2938.5,959.42
USB2_N: J8.A42 L7.2 | length 2051.9
  L1 w9.84: v1(2826,2145) 2826,2151.62 2844.09,2169.71 J8.A42@2844.09,2235.34
  L6 w9.84: L7.2@2225.75,792.06 2225.75,782.6 2205.15,762 2184,762 2182.54,763.46 2181.89,763.46 2175.55,769.81 2175.55,824.61 2352.28,1001.34 2352.28,2077.62 2394.66,2120 2801,2120 v1(2826,2145)
USB2_P: J8.A43 L7.1 | length 2050.2
  L1 w9.84: v1(2855,2150) 2855,2152.46 2863.77,2161.23 J8.A43@2863.77,2235.34
  L6 w9.84: L7.1@2194.25,792.06 2194.25,818.25 2370,994 2370,2015.72 2374.96,2020.68 2385.56,2020.68 2390.52,2025.64 2390.52,2035.56 2385.56,2040.52 2374.96,2040.52 2370,2045.48 2370,2070.28 2402,2102.28 2729.59,2102.28 2734.55,2097.32 2734.55,2086.72 2739.51,2081.76 2749.43,2081.76 2754.39,2086.72 2754.39,2097.32 2759.35,2102.28 2769.28,2102.28 2774.24,2097.32 2774.24,2086.72 2779.2,2081.76 2789.12,2081.76 2794.08,2086.72 2794.08,2097.32 2799.04,2102.28 2813.91,2102.28 2855,2143.38 v1(2855,2150)
USB3_N: J8.B42 L8.1 | length 2188.2
  L1 w9.84: v1(2825,2395) 2844.09,2414.09 J8.B42@2844.09,2484
  L6 w9.84: L8.1@2109.25,792.06 2114.17,796.98 2114.17,810.55 2318.82,1015.2 2318.82,2091.48 2373,2145.66 2373,2208.34 2447.38,2282.72 2775,2282.72 2799,2306.72 2799,2369 v1(2825,2395)
USB3_P: J8.B43 L8.2 | length 2183.3
  L1 w9.84: v1(2825,2360) 2863.77,2398.77 J8.B43@2863.77,2484
  L6 w9.84: L8.2@2140.75,792.06 2140.75,812.07 2336.54,1007.86 2336.54,2084.14 2390.72,2138.33 2390.72,2201 2454.72,2265 2782.34,2265 2816.72,2299.38 2816.72,2351.72 v1(2825,2360)
USB4+: J8.A40
USB4-: J8.A39
USB5+: J8.B40
USB5-: J8.B39
USB6+: J8.A37
USB6-: J8.A36
USB7+: J8.B37
USB7-: J8.B36
USB_4_5_OC#: J8.B38
USB_6_7_OC#: J8.A38
USB_HOST_PRSNT: J8.B96
USBDN2_CON_N: D13.3 J7.2 L7.3 | length 1176.3
  L1 w9.84: v1(2275,692.64) 2275,677.64 D13.3@2300,652.64
  L6 w9.84: J7.2@2096.26,397.64 2123.1,370.8 2126.77,367.13 2126.77,331.23 2146.72,311.28 2306.28,311.28 2363,368 2469.05,368 2498.72,397.66 2498.72,585.28 2476,608 2239.05,608 2218.86,628.2 2218.86,683.65 2225.75,690.54 L7.3@2225.75,713.22 2254.42,713.22 v1(2275,692.64)
USBDN2_CON_P: D13.2 J7.3 L7.4 | length 1176.3
  L1 w9.84: v1(2270,762.64) D13.2@2300,732.64
  L6 w9.84: J7.3@2175,397.64 2144.49,367.13 2144.49,347.51 2163,329 2298.95,329 2355.66,385.72 2461.72,385.72 2481,405 2481,577.95 2468.66,590.28 2306.13,590.28 2301.17,585.32 2301.17,575.48 2296.2,570.52 2286.28,570.52 2281.32,575.48 2281.32,585.32 2276.36,590.28 2231.72,590.28 2201.14,620.86 2201.14,683.65 2194.25,690.54 L7.4@2194.25,713.22 2194.25,722.67 2234.22,762.64 v1(2270,762.64)
USBDN3_CON_N: D12.3 J7.6 L8.4 | length 470.3
  L6 w9.84: D12.3@1961.4,711 1996.59,711 2001.55,706.04 2001.55,693.42 2006.51,688.46 2016.43,688.46 2021.39,693.42 2021.39,728.58 2026.35,733.54 2036.28,733.54 2041.24,728.58 2041.24,693.42 2046.2,688.46 2056.12,688.46 2061.08,693.42 2061.08,706.04 2066.04,711 2106,711 L8.4@2108,713 ; J7.6@2096.26,500.79 2110,514.53 L8.4@2110,706
USBDN3_CON_P: D12.2 J7.7 L8.3 | length 473.5
  L6 w9.84: D12.2@1961.4,791 1961.4,763.08 1964.62,759.86 2007,759.86 2007.14,760 ; 2004,760 2007.14,760 ; 2037,759.86 2121.06,759.86 2140.75,740.17 L8.3@2140.75,713.22 2140.75,535.04 J7.7@2175,500.79 ; 2037,760 2007.14,760
VBUS: C6.2 D19.1 U1.54 | length 1039.3
  L1 w10: U1.54@6676.86,1822.59 6807.29,1692.16 C6.2@6837.16,1692.16 6837.16,1412.84 D19.1@7222.99,1027.01
VCC_EXT: P8.10 R58.2 R71.2 | length 588.4
  L1 w20: v2(7220,5790) 7329.69,5790 R71.2@7335,5784.69 7335,5930 7440,6035 P8.10@7527.09,6035
  L6 w20: R58.2@7130,5789.37 7219.37,5789.37 v2(7220,5790)
VCC_Reg: C42.1 R28.1 R35.1 U17.3 U17.4 U17.20 U17.27 U17.32 | length 1855.4
  L1 w12: v2@2113.41,5263.41 v2(2115,5265)
  L1 w25: v2(1870,5100) 1979.28,5100 2113.41,5234.13 v2@2113.41,5263.41 ; v2(2115,5265) 2190,5265 v2(2220,5235) 2270,5235 2290,5215 v1(2290,5135) 2400,5135 v2(2405,5140) 2515,5140 ; v1(2455,4920) 2530,4920 2560,4950 2560,5095 2515,5140 ; C42.1@2635,5305 2580,5305 2560,5285 2560,5165 2535,5140 2515,5140
  L6 w12: v2(1870,5100) 2030.35,5100 U17.20@2030.51,5100.16 ; U17.27@2095.47,5216.3 2095.47,5259.53 2109.53,5259.53 v2(2115,5265) ; U17.32@2193.9,5212.49 2193.9,5223.9 2205,5235 v2(2220,5235) ; U17.3@2219.49,5139.53 2219.49,5119.84 U17.4@2227.49,5119.84 2284.84,5119.84 2290,5125 v1(2290,5135) ; R35.1@2364.68,5145 2400,5145 v2(2405,5140)
  L6 w25: R28.1@2455,4895 v1(2455,4920)
WAKE0#: J8.B66
WAKE1#: J8.B67
WDT: J8.B27
pads on no net: D23.3 FID1.1 FID2.1 FID3.1 FID4.1 J1.4 J1.6 J2.23 J3.2 J4.15 J4.16 J5.13 J5.14 J8.0 J8.2 J8.221 J8.222 J8.A54 J8.A82 J8.A100 J8.B84 J8.B85 J8.B86 J8.B87 J27.5 J27.6 J28.1 J28.4 J28.6 J28.7 J28.8 J28.9 J28.10 J28.13 J28.15 J28.16 J28.17 J28.18 J29.1 J31.1 J31.4 J31.6 J31.7 J31.8 J31.9 J31.10 J31.13 J31.15 J31.16 J31.17 J31.18 K1.3 K1.4 K1.5 K2.3 K2.4 K2.5 P5.7 U1.1 U1.3 U1.4 U1.5 U1.14 U1.17 U1.18 U1.19 U1.20 U1.21 U1.22 U1.23 U1.24 U1.25 U1.32 U1.33 U1.34 U1.35 U1.38 U1.41 U1.42 U1.43 U1.44 U1.47 U1.48 U1.51 U1.52 U1.53 U1.60 U1.61 U1.66 U1.67 U1.68 U1.69 U1.72 U1.76 U1.77 U1.79 U1.80 U1.81 U1.82 U1.83 U1.84 U1.85 U1.87 U1.88 U1.91 U1.92 U1.93 U1.94 U1.95 U10.9 U13.2 U14.3 U14.4 U14.6 U14.10 U14.34 U14.35 U16.5 U17.28 U18.5 U19.3 U19.6 U20.11 U20.14 U22.11 U22.14 U23.11 U23.14
copper on no net:
  other v3: 1493,2277 4481.11,2276.99 4483,4125 1492.23,4130.23
  other v4: 632.87,1663.39 7798.23,1663.39 632.87,4488.19 7798.23,4488.19
  other v5: 703.74,936.02 7727.36,936.02 703.74,5215.55 7727.36,5215.55

## Polygon pours and split planes (outlines as drawn)
+VIN on L4 (PWR) "+VIN_L04_P062" (solid, remove dead copper, pour order 62): 1505,5485 1465,5485 1375,5390 1375,5275 1623.25,5275 1625,5276.75 1625,4895 1625,4719.99 1715,4719.99 1715,5030 2915,5030 3966.44,3978.56 3970.77,2684.23 4040,2615 4040,2580 3971.35,2511.35 3971.49,2468.66 3946.45,2450 2112.02,2452.98 1960,2605 1790,2775 980,2775 980,2595 1625,2595 1795,2425 2050,2170 3970,2170 3972.5,2167.5 3980,2115 3975,2110 4280,2110 4280,4192.91 4392.09,4305 4670,4305 4670,4720 4235,4720 3770,5185 2836.67,5177.99 2800.72,5215 2633.86,5215 2595.03,5176.17 2485,5175.35 2465.81,5194.53 2440,5194.53 2335.47,5194.53 2315.01,5174.07 1795,5170.16 1794.26,5375 2025,5375 2025,5485 2024.16,5484.16 1793.86,5484.16 1793.86,5485
PWR_OUT2 on L4 (PWR) "PWR_OUT2_L04_P068" (solid, pour order 68): 1690,145 1690,355 889,355 889,145 495,145 190,450 190,2365 395,2365 395,4885 215,5065 215,5530 1246.55,5530 1249.41,5528.11 1405.65,5684.35 2255,5684.35 2255,5315 2195,5255 2160,5255 2045,5370 2045,5505 1385,5505 1345,5465 1345,5277.09 1595,5027.09 1595,4700 1600,4695 1740,4695 1740,4930 1820,5010 1825,5005 2910,5005 3950,3965 3950,2680 4025,2605 4025,2575 3990,2540 3850,2540 3715,2675 3715,3780 2640,4855 2120,4855 2120,4760 2120,4580 1965,4425 1550,4425 1435,4540 1340,4540 1340,4950 1210,5080 1030,5080 870,4920 870,3535 1120,3535 1170,3485 1170,3150 1130,3110 655,3110 625,3080 625,2270 980,2270 980,2180 975,2175 953.1,2153.1 953.1,579.92 2019.92,579.92 2485,1045 3780,1045 3800,1065 3800,1240 3840,1280 3845,1280 3850,1280 4015,1280 4650,1915 4885,1915 4970,2000 4970,2940 4682.5,3227.5 4682.5,3455.76 4680,3458.26 4680,3510 5595,4425 5620.23,4425 6955,4425 7975,4425 8205,4655 8205,5425 8085,5545 7955,5675 7955,5690 8025,5760 8050,5760 8160,5650 8325,5485 8325,4500 8071.68,4246.68 6955,4246.68 6955,4065 6955,3405 8025,2335 8025,145
+5V on L4 (PWR) "+5V_L04_P080" (solid, pour order 80): 6570,4480 6570,4500 6565,4505 6376.14,4505 6370,4498.86 6370,4480 5624.41,4480 4665,3520.59 4665,3235 4665,3205 4940,2930 4945,2930 4945,2000 4895,1950 4655,1950 4005,1300 3835,1300 3785,1250 3785,1085 2500,1085 2030,615 1000,615 1000,2275 991.61,2293.46 681.54,2293.46 655,2320 655,3045.94 652.12,3048.82 675,3090 1135,3090 1205,3160 1205,3480 1135,3550 960,3550 885,3625 885,4905 1040,5060 1202.9,5060 1312.9,4950 1312.9,4503.46 1435.43,4503.46 1541.56,4397.34 1548.9,4390 1981.46,4388.54 2190,4597.08 2190,4830 2310,4830 2340,4800 2340,4508.8 1873.46,4042.27 1873.46,2790 925,2790 925,2580 1590,2580 2051,2119 3906,2119 3948.07,2076.93 4300,2076.93 4300,4147.21 4427.79,4275 4710,4275 4710,4745 4265,4745 3802.01,5207.99 3477.01,5207.99 3405,5280 3405,5750 3455,5800 5845,5800 5845,5679.36 7860.64,5679.36 8050,5490 8050,5060 7470,4480
+V_INPUT on L4 (PWR) "+V_INPUT_L04_P074" (solid, pour order 74): 375,6100 375,5575 1250,5575 1475,5800 1475,6100
GND on L1 "GND_L01_P086" (solid, pour order 86): -5,6165 -5,-5 8390,-5 8390,6165
NetD15_1 on L1 "NETD15_1_L01_P076" (solid, pour order 76): 1705,5580 1705,5524 2055,5524 2055,6125 910,6125 910,5770 460,5770 460,5580
NetC62_2 on L3 "NETC62_2_L03_P082" (solid, remove dead copper, pour order 82): 855,5490 853.07,5491.93 853.07,5714.89 2299.89,5714.89 2300,5715 2310,5705 2310,5490
GND on L6 "GND_L06_P088" (solid, pour order 88): -5,6165 -5,-5 8390,-5 8390,6165
GND on L2 (split plane): 185 vertices, not listed, extent 16.68,16.6 8369.47,6140.72
GND on L5 (split plane): 185 vertices, not listed, extent 16.68,16.6 8369.47,6140.72

## Other copper
L1:
  rectangle net PWR_OUT2: 5933,1091 5961,1197
  rectangle net PWR_OUT2: 5507,1091 5536,1197
  rectangle net GND: 1000,3075 1145,3210
  rectangle net +5V: 1000,2925 1155,3060
  rectangle net +V_INPUT: 525,5915 885,6040
  rectangle net +VIN: 1955,5430 2080,5464.37
  rectangle net +VIN: 1950,5375 2025,5470
  rectangle net NetC62_2: 885,5535 1035,5575
  rectangle net +5V: 1145,4675 1265,5020
  rectangle net NetC46_2: 1504.34,4830 1644.02,4920
  rectangle net +VIN: 1630,4730 1690,4790
  rectangle net +VIN: 1625,5095 1705,5190
  rectangle net +VIN: 1377.5,5315 1465,5425
  rectangle net +VIN: 1465,5355 1610,5485
  rectangle net PWR_OUT2: 1125,5096.5 1185,5480
  rectangle net PWR_OUT2: 1120,5160 1315,5310
  rectangle net NetC62_2: 918.93,5510 1035,5575
  rectangle net PWR_OUT2: 4719,2092 4749,2209.84
L5 (plane layer: these items are gaps in the copper):
  lines w6: 0,-120.08 8385.83,-120.08 ; 0,-21.65 8385.83,-21.65 ; 0,6179.13 8385.83,6179.13 ; 0,6257.87 8385.83,6257.87

## Silkscreen, mask and mechanical layers (free items; w line width, h text height)
Top Overlay:
  drawing of 10928 lines, arcs and shapes, not listed
  text "CAN Bus" at 4965,5870 h50
  text "RS-485" at 3590,5850 h60
  text "GPIO" at 6905,5815 h60
  text "RST BTN" at 2905,5580 h60
  text "PWR BTN" at 2405,5570 h60
  text "INPUT PWR" at 160,5545 h60
  text "+12V" at 160,5435 h60
  text "Switch" at 1695,5400 h60
  text "3.3V" at 2500,5370 h60
  text "+3.3V" at 3450,5285 h60
  text "GND" at 5070,5250 h60
  text "CNH" at 4860,5245 h60
  text "CNL" at 5280,5245 h60
  text "+5V" at 4007,5242 h60
  text "+ - - +" at 3400,5225 h60
  text "+ - - +" at 3890,5195 h60
  text "R2-" at 5425,5005 h40
  text "R2+" at 5560,5005 h40
  text "R1-" at 5695,5005 h40
  text "R1+" at 5830,5005 h40
  text "IN1" at 5965,5005 h40
  text "GND" at 6100,5005 h40
  text "IN2" at 5425,4920 h40
  text "OT1" at 5560,4920 h40
  text "OT2" at 5695,4920 h40
  text "VCC" at 5830,4920 h40
  text "GE+" at 5960,4920 h40
  text "GE-" at 6100,4920 h40
  text "+5V" at 1325,4485 h60
  text "12V" at 4525,4400 h40
  text "GND" at 4675,4400 h40
  text "ESP8266" at 6850,4265 h60 r270
  text "WiFi" at 6960,4260 h60 r270
  text "SDA/GND/SCL" at 6011,4227 h40
  text "I2C" at 6420,4079 h60
  text "COM Express Type 10 mini" at 1795,3555 h98.43
  text "GPIO" at 5475,3050 h60
  text "SYNCBOX / 1850 / V3I1 / GNU License" at 7650,2530 h98.43
  text "DnE AB" at 7765,2470 h60
  text "ICSP" at 5797,2242 h60 r315
  text "uController" at 6160,1545 h60
  text "RS-232" at 6560,645 h60
  text "RS-232" at 4791,638 h60
  text "ETHERNET" at 1100,627.64 h60
  text "HDMI" at 3855,580 h60
  text "PROG" at 7720,575 h60
  text "USB 3" at 1780,97.64 h60 r90
  text "USB2" at 2525,67.64 h60 r90
Mechanical Drawing:
  circle w10: c703.74,5215.55 r236.22
  circle w10: c632.87,4488.19 r137.8
  circle w10: c1495,4125 r110.24
  circle w10: c4485,4125 r110.24
  circle w10: c1490,2275 r110.24
  circle w10: c4485,2270 r110.24
  circle w10: c703.74,936.02 r236.22
  circle w10: c632.87,1663.39 r137.8
  circle w10: c7727.36,936.02 r236.22
  circle w10: c7798.23,1663.39 r137.8
  circle w10: c7798.23,4488.19 r137.8
  circle w10: c7727.36,5215.55 r236.22
  lines w6: 0,175 0,149.77 ccw(c149.77,149.77) 149.77,0 8215,0 ; 0,1611.25 0,150 0,2430 310,2430 310,4105 0,4105 0,5995 ; 0,5980 cw(c176.24,5981.24) 175,6157.48 ; 162.48,6157.48 8227.52,6157.48 ; 8200,0 ccw(c8205.41,180.41) 8385.83,175 ; 8225,6157.48 cw(c8214.17,5985.83) 8385.83,5975 ; 8385.83,170.83 8385.83,5999.17
  lines w10: -100,4115 0,4115 ; -90.87,4154.49 -70.87,4094.49 ; -90.87,6136.85 -70.87,6196.85 ; -80.87,4094.49 -60.87,4094.49 ; -80.87,6196.85 -60.87,6196.85 ; -70.87,4754.79 -70.87,4094.49 ; -70.87,5536.55 -70.87,6196.85 ; -60,4095 0,4115 ; -60,4135 0,4115 ; -50.87,4154.49 -70.87,4094.49 ; -50.87,6136.85 -70.87,6196.85 ; 0,4105 0,4125 ; 0,6186.85 0,6206.85 ; 60,6176.85 0,6196.85 ; 60,6216.85 0,6196.85 ; 310,4105 310,4125 ; 330,2490 350,2430 ; 330,4045 350,4105 ; 340,2430 360,2430 ; 340,4105 360,4105 ; 350,2991.58 350,2430 ; 350,3543.42 350,4105 ; 370,2490 350,2430 ; 370,4045 350,4105 ; 370,4095 310,4115 ; 370,4135 310,4115 ; 410,4115 310,4115 ; 3797.04,6196.85 0,6196.85 ; 4588.79,6196.85 8385.83,6196.85 ; 8325.83,6176.85 8385.83,6196.85 ; 8325.83,6216.85 8385.83,6196.85 ; 8385.83,6186.85 8385.83,6206.85
  text "Mechanical Drawing of SYNCBOX" at 917.17,6675.51 h137.8
  text "8385.827 (mil)" at 3807.04,6160.86 h60
  text "2102.362 (mil)" at -34.88,4764.79 h60 r90
  text "310 (mil)" at -80.93,3971.04 h60
  text "1675 (mil)" at 385.99,3001.58 h60 r90
Manufacturing Notes:
  drawing of 641 lines, arcs and shapes, not listed
  text "Board info" at 8847.83,8396.85 h60
  text "Minimum Track: 200um" at 8847.83,8298.43 h60
  text "Minimum Gap: 150um" at 8847.83,8200 h60
  text "Minimum Through Hole VIA: 0.45mm (pad) / 0.2mm (drill). Drilling: L1-L6" at 8847.83,8101.57 h60
  text "SYNCBOX" at 157.44,7954.88 h118.11
  text ".VersionRevision" at 3011.77,7954.88 h118.11
  text "1. REMOVE ALL NON-FUNCTIONAL INNER LAYER PADS." at 8847.83,7904.72 h60
  text "2. THIS BOARD CONTAINS IMPEDANCE CONTROLLED TRACKS, TRACK AND GAP SIZES ARE AS FOLLOWS:" at 8847.83,7707.87 h60
  text "Designed by ALTAY" at 1732.24,7659.61 h60
  text "www.bu.com.tr" at 1732.24,7561.18 h60
  text "Copyright  / Bogazici University / 2018" at -45,7520 h60
  text "TYPE;" at 9044.68,7511.02 h60
  text "Impedance;" at 9536.81,7511.02 h60
  text "Layer (Reference);" at 10422.64,7511.02 h60
  text "Width (um);" at 11800.59,7511.02 h60
  text "Gap (um);" at 12587.99,7511.02 h60
  text "DIFF;" at 9044.68,7314.17 h60
  text "90ohm;" at 9536.81,7314.17 h60
  text "L1(L2), L6(L5);" at 10422.64,7314.17 h60
  text "250" at 11800.59,7314.17 h60
  text "200" at 12587.99,7314.17 h60
  text "Contact:" at 157.44,7265.91 h60
  text "DIFF;" at 9044.68,7215.75 h60
  text "90ohm;" at 9536.81,7215.75 h60
  text "L3(L2,L4)" at 10422.64,7215.75 h60
  text "200" at 11800.59,7215.75 h60
  text "250" at 12587.99,7215.75 h60
  text "altay_bn@yahoo.com" at 157.44,7167.48 h60
  text "DIFF;" at 9044.68,7018.9 h60
  text "100ohm;" at 9536.81,7018.9 h60
  text "L1(L2), L6(L5);" at 10422.64,7018.9 h60
  text "250" at 11800.59,7018.9 h60
  text "400" at 12587.99,7018.9 h60
  text "DIFF;" at 9044.68,6920.47 h60
  text "100ohm;" at 9536.81,6920.47 h60
  text "L3(L2,L4)" at 10422.64,6920.47 h60
  text "200" at 11800.59,6920.47 h60
  text "500" at 12587.99,6920.47 h60
  text "SE;" at 9044.68,6723.62 h60
  text "55ohm;" at 9536.81,6723.62 h60
  text "L1(L2), L6(L5);" at 10422.64,6723.62 h60
  text "250" at 11800.59,6723.62 h60
  text "SE;" at 9044.68,6625.2 h60
  text "55ohm;" at 9536.81,6625.2 h60
  text "L3(L2,L4)" at 10422.64,6625.2 h60
  text "200" at 11800.59,6625.2 h60
  text "3. FINISHED PANEL THICKNESS IS NOT CRITICAL: TO BE APPROXIMATELY 1.6mm" at 8847.83,6428.35 h60
  text "4. BOARD FINISH: IMMERSION Au/ELECTROLESS Ni; 0.05-0.12 um GOLD; 3-6um NICKEL" at 8847.83,6231.5 h60
  text "5. SOLDER RESIST: APPLY TO BOTH SIDES COLOUR - BLUE" at 8847.83,6034.65 h60
  text "6. COMPONENT IDENT: COLOUR TO BE WHITE" at 8847.83,5837.8 h60
  text "7. PANELIZE THE BOARD (2PCS PER PANEL). PLACE FIDUCIALS ON THE PANEL STRIPS AS FOLLOWS:" at 8847.83,5640.94 h60
  text "- FIDUCIAL DIAMTER 1-1.5MM, SOLDER MASK OPENING AT LEAST 1MM GREATER THAN FIDUCIAL" at 9044.68,5542.52 h60
  text "- MINIMUM 4MM DISTANCE FROM THE PANEL EDGE" at 9044.68,5444.09 h60
  text "- 3 FIDUCIALS SHOULD LIE ON TWO LINES THAT INTERSECT AT A RIGHT ANGLE" at 9044.68,5345.67 h60
  text "- PLACE ONE FIDUCIAL INTO EACH PANEL CORNER (FOUR ON THE TOP AND FOUR ON THE BOTTOM LAYER)" at 9044.68,5247.24 h60
  text "Layer" at 9042.17,5181.96 h60
  text "Name" at 9452.08,5181.96 h60
  text "Material" at 10381.82,5181.96 h60
  text "Thickness" at 11241.59,5181.96 h60
  text "Constant" at 11891.43,5181.96 h60
  text "Board Layer Stack" at 12461.29,5181.96 h60
  text "1" at 9042.17,5061.96 h60
  text "Top Overlay" at 9452.08,5061.96 h60
  text "2" at 9042.17,4941.96 h60
  text "Top Solder" at 9452.08,4941.96 h60
  text "Solder Resist" at 10381.82,4941.96 h60
  text "0.40mil" at 11241.59,4941.96 h60
  text "3.5" at 11891.43,4941.96 h60
  text "3" at 9042.17,4821.96 h60
  text "L1" at 9452.08,4821.96 h60
  text "Copper" at 10381.82,4821.96 h60
  text "0.71mil" at 11241.59,4821.96 h60
  text "4" at 9042.17,4701.96 h60
  text "Dielectric1" at 9452.08,4701.96 h60
  text "DE 104 ML" at 10381.82,4701.96 h60
  text "6.79mil" at 11241.59,4701.96 h60
  text "4.4" at 11891.43,4701.96 h60
  text "5" at 9042.17,4581.96 h60
  text "L2" at 9452.08,4581.96 h60
  text "Copper" at 10381.82,4581.96 h60
  text "0.71mil" at 11241.59,4581.96 h60
  text "6" at 9042.17,4461.96 h60
  text "Dielectric4" at 9452.08,4461.96 h60
  text "DE 104 ML" at 10381.82,4461.96 h60
  text "7.72mil" at 11241.59,4461.96 h60
  text "4.4" at 11891.43,4461.96 h60
  text "7" at 9042.17,4341.96 h60
  text "L3" at 9452.08,4341.96 h60
  text "Copper" at 10381.82,4341.96 h60
  text "0.71mil" at 11241.59,4341.96 h60
  text "8" at 9042.17,4221.96 h60
  text "Dielectric2" at 9452.08,4221.96 h60
  text "DE 104 ML" at 10381.82,4221.96 h60
  text "27.44mil" at 11241.59,4221.96 h60
  text "4.4" at 11891.43,4221.96 h60
  text "9" at 9042.17,4101.96 h60
  text "L4 (PWR)" at 9452.08,4101.96 h60
  text "Copper" at 10381.82,4101.96 h60
  text "0.71mil" at 11241.59,4101.96 h60
  text "10" at 9042.17,3981.96 h60
  text "Dielectric3" at 9452.08,3981.96 h60
  text "DE 104 ML" at 10381.82,3981.96 h60
  text "7.72mil" at 11241.59,3981.96 h60
  text "4.4" at 11891.43,3981.96 h60
  text "11" at 9042.17,3861.96 h60
  text "L5" at 9452.08,3861.96 h60
  text "Copper" at 10381.82,3861.96 h60
  text "0.71mil" at 11241.59,3861.96 h60
  text "12" at 9042.17,3741.96 h60
  text "Dielectric5" at 9452.08,3741.96 h60
  text "DE 104 ML" at 10381.82,3741.96 h60
  text "6.79mil" at 11241.59,3741.96 h60
  text "4.4" at 11891.43,3741.96 h60
  text "13" at 9042.17,3621.96 h60
  text "L6" at 9452.08,3621.96 h60
  text "Copper" at 10381.82,3621.96 h60
  text "0.71mil" at 11241.59,3621.96 h60
  text "14" at 9042.17,3501.96 h60
  text "Bottom Solder" at 9452.08,3501.96 h60
  text "Solder Resist" at 10381.82,3501.96 h60
  text "0.40mil" at 11241.59,3501.96 h60
  text "3.5" at 11891.43,3501.96 h60
  text "15" at 9042.17,3381.96 h60
  text "Bottom Overlay" at 9452.08,3381.96 h60

## Dimensions
8449.01,0.95 to 8444.01,6170.95 on Mechanical Drawing
703.74,5215.55 to 830,5620 on Mechanical Drawing
632.87,4488.19 to 695,4760 on Mechanical Drawing
632.87,1663.39 to 690,2005 on Mechanical Drawing
703.74,936.02 to 740,1365 on Mechanical Drawing
1495,4125 to 1485,4395.59 on Mechanical Drawing